# Altium PCB RADAR_D79_POWER_24V_v0.9.3.36_R10_3_36_IMPEDANCE_CLEAR_ROUTE_NATIVE.PcbDoc (part 8 of 9)
Units mil, origin at the board's own origin, x right, y up, seen from the top; angles counter-clockwise.
Board outline 3110.24 x 3110.24 mil, 10 copper layers (Top Layer, RF_GND, SIG_A0, SIG_A1, PWR_A, PWR_B, SIG_B1, SIG_B0, DIGITAL_GND, Bottom Layer), stack 79.002 mil thick; 304 components, 269 nets, 1408 pads, 1372 vias.
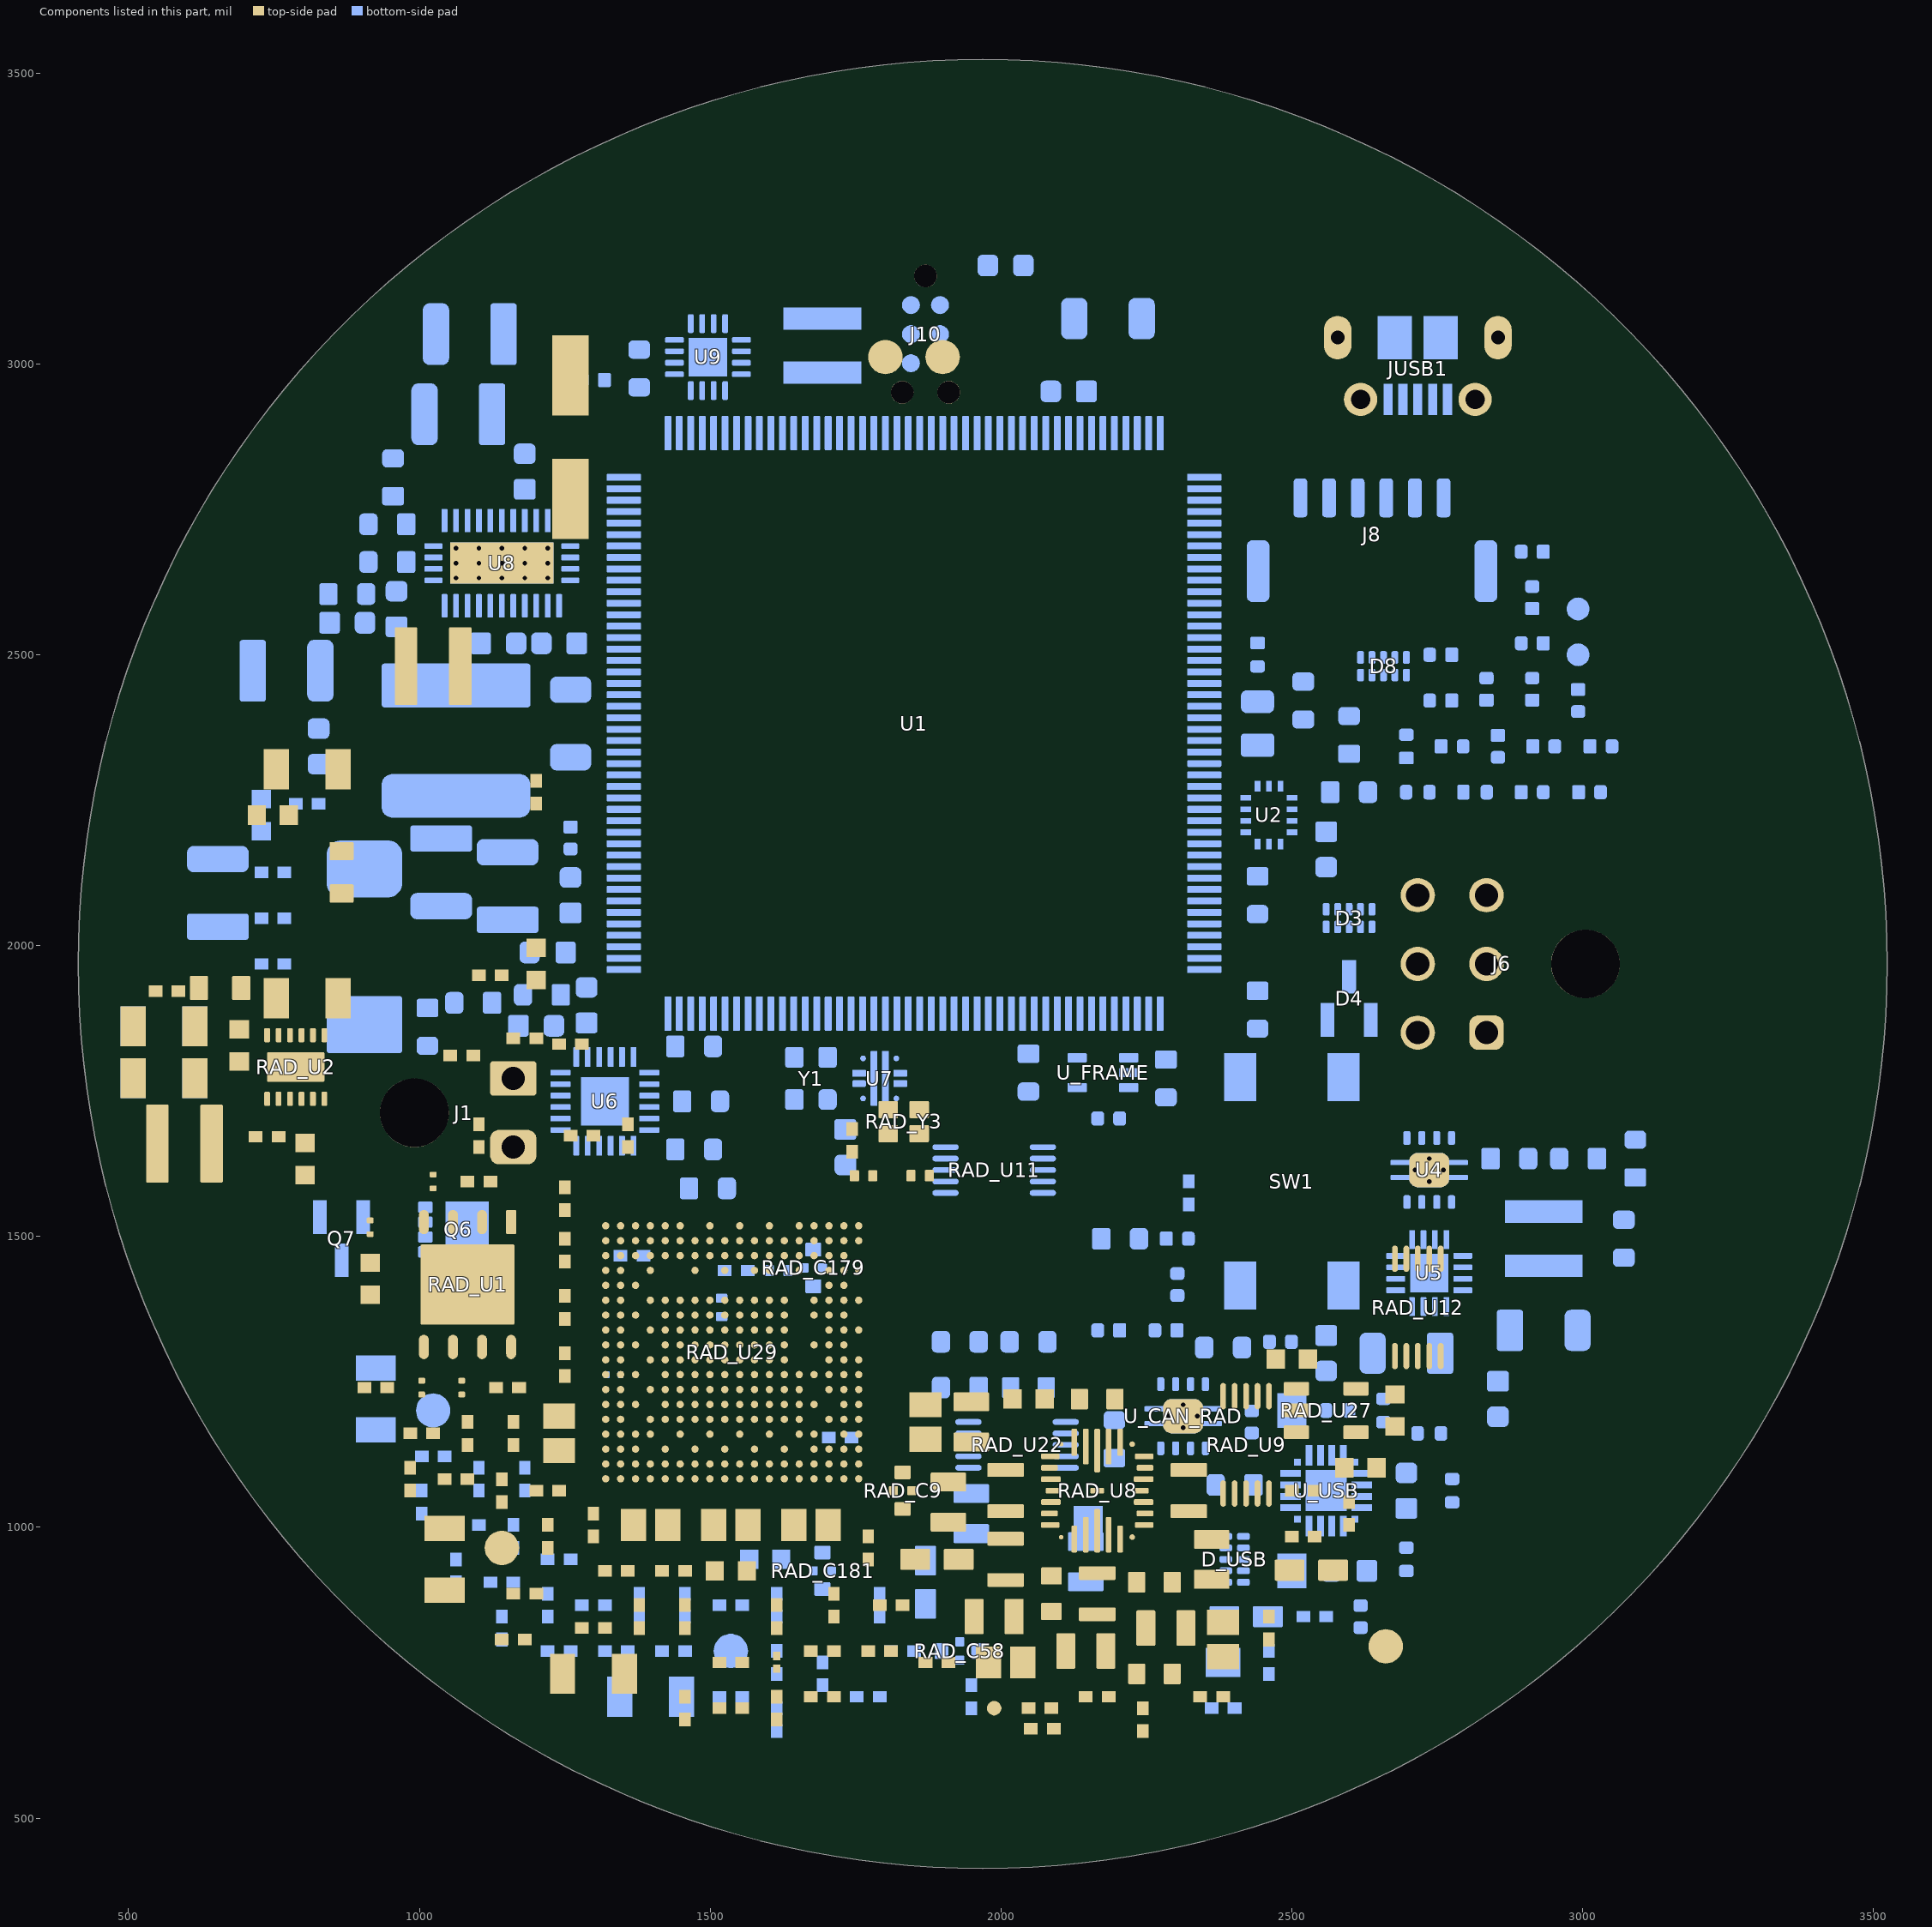
[diagram p16: the components of this part, seen from the top]

## Polygon pours and split planes (outlines as drawn) (continued)
V12_SYS on PWR_A "R10_3_28_V12_SYS_373" (solid, pour order 373): 1188.03,2108.08 1103.31,2025.78 1278.32,1845.63 1363.04,1927.92
V12_SYS on PWR_A "R10_3_28_V12_SYS_374" (solid, pour order 374): 1220.47,1988.19 1220.47,1870.08 1643.7,1870.08 1643.7,1988.19
V12_SYS on PWR_A "R10_3_28_V12_SYS_375" (solid, pour order 375): 1584.65,2012.65 1501.13,1929.13 1702.76,1727.51 1786.27,1811.02
V12_SYS on PWR_A "R10_3_28_V12_SYS_376" (solid, pour order 376): 1761.81,1870.08 1643.7,1870.08 1643.7,1692.91 1761.81,1692.91
V12_SYS on PWR_A "R10_3_28_V12_SYS_377" (solid, pour order 377): 1702.76,1835.49 1619.24,1751.97 1724.27,1646.94 1807.78,1730.46
V12_SYS on PWR_A "R10_3_28_V12_SYS_378" (solid, pour order 378): 1724.27,1742.98 1711.74,1730.46 1751.97,1690.23 1764.5,1702.76
V12_SYS on PWR_A "R10_3_28_V12_SYS_379" (solid, pour order 379): 1743.11,1711.61 1743.11,1693.9 1770.67,1693.9 1770.67,1711.61
V12_SYS on PWR_A "R10_3_28_V12_SYS_380" (solid, pour order 380): 1751.39,1709.7 1754.86,1692.33 1782.08,1697.78 1778.6,1715.15
RADAR_12V on PWR_A "R10_3_28_RADAR_12V_395" (solid, pour order 395): 1759.92,1840.79 1765.51,1826.07 1791.65,1835.98 1786.07,1850.71
RADAR_12V on PWR_A "R10_3_28_RADAR_12V_396" (solid, pour order 396): 1776.93,1850.71 1771.34,1835.98 1797.48,1826.07 1803.07,1840.79
RADAR_12V on PWR_A "R10_3_28_RADAR_12V_397" (solid, pour order 397): 1785.04,1844.09 1785.04,1828.35 1823.62,1828.35 1823.62,1844.09
RADAR_12V on PWR_A "R10_3_28_RADAR_12V_398" (solid, pour order 398): 675.37,1901.28 671.55,1886 694.71,1880.22 698.52,1895.49
RADAR_12V on PWR_A "R10_3_28_RADAR_12V_399" (solid, pour order 399): 681.1,1897.64 681.1,1881.89 716.54,1881.89 716.54,1897.64
RADAR_12V on PWR_A "R10_3_28_RADAR_12V_400" (solid, pour order 400): 697.64,1891.34 707.09,1878.74 727.56,1894.09 718.11,1906.69
RADAR_12V on PWR_A "R10_3_28_RADAR_12V_401" (solid, pour order 401): 706.58,1900.65 711.56,1885.71 738.31,1894.63 733.33,1909.57
RADAR_12V on PWR_A "R10_3_28_RADAR_12V_402" (solid, pour order 402): 720.47,1907.48 720.47,1891.73 765.75,1891.73 765.75,1907.48
RADAR_12V on PWR_A "R10_3_28_RADAR_12V_403" (solid, pour order 403): 746.79,1900.68 756.8,1888.52 802.42,1926.09 792.41,1938.25
RADAR_12V on PWR_A "R10_3_28_RADAR_12V_404" (solid, pour order 404): 786.36,1917.21 801.3,1922.19 792.38,1948.94 777.44,1943.96
RADAR_12V on PWR_A "R10_3_28_RADAR_12V_405" (solid, pour order 405): 779.53,1931.1 795.28,1931.1 795.28,1956.69 779.53,1956.69
RADAR_12V on PWR_A "R10_3_28_RADAR_12V_406" (solid, pour order 406): 776.38,1950.39 785.83,1937.8 806.3,1953.15 796.85,1965.75
RADAR_12V on PWR_A "R10_3_28_RADAR_12V_412" (solid, pour order 412): 690.16,1898.2 674.63,1900.79 670.07,1873.45 685.61,1870.86
RADAR_12V on PWR_A "R10_3_28_RADAR_12V_413" (solid, pour order 413): 687.01,1887.8 671.26,1887.8 671.26,1837.55 687.01,1837.55
RADAR_12V on PWR_A "R10_3_28_RADAR_12V_414" (solid, pour order 414): 704.72,1871.02 653.54,1871.02 653.54,1785.43 704.72,1785.43
RADAR_12V on PWR_A "R10_3_28_RADAR_12V_415" (solid, pour order 415): 680.86,1847.17 642.98,1812.75 685.53,1765.95 723.4,1800.38
RADAR_12V on PWR_A "R10_3_28_RADAR_12V_416" (solid, pour order 416): 687.78,1813.22 676.12,1802.63 717.97,1756.59 729.63,1767.19
VIN_RAW on PWR_A "R10_3_28_VIN_RAW_431" (solid, pour order 431): 966.78,1413.91 952.24,1403.79 978.1,1366.61 992.65,1376.72
VIN_RAW on PWR_A "R10_3_28_VIN_RAW_432" (solid, pour order 432): 989.17,1387.8 971.46,1387.8 971.46,1343.5 989.17,1343.5
VIN_RAW on PWR_A "R10_3_28_VIN_RAW_433" (solid, pour order 433): 990.51,1371.66 987.6,1389.13 964.22,1385.23 967.13,1367.76
VIN_RAW on PWR_A "R10_3_28_VIN_RAW_434" (solid, pour order 434): 983.27,1369.09 983.27,1386.81 955.71,1386.81 955.71,1369.09
VIN_RAW on PWR_A "R10_3_28_VIN_RAW_435" (solid, pour order 435): 974.87,1370.82 971.7,1388.25 943.44,1383.12 946.61,1365.68
VIN_RAW on PWR_A "R10_3_28_VIN_RAW_436" (solid, pour order 436): 962.6,1384.84 944.88,1384.84 944.88,1340.55 962.6,1340.55
VIN_RAW on PWR_A "R10_3_28_VIN_RAW_437" (solid, pour order 437): 963.52,1341.58 961.57,1359.19 935.1,1356.25 937.06,1338.64
VIN_RAW on PWR_A "R10_3_28_VIN_RAW_438" (solid, pour order 438): 953.74,1339.57 953.74,1357.28 926.18,1357.28 926.18,1339.57
VIN_RAW on PWR_A "R10_3_28_VIN_RAW_439" (solid, pour order 439): 929.95,1336.98 946.49,1343.34 935.21,1372.67 918.67,1366.31
VIN_RAW on PWR_A "R10_3_28_VIN_RAW_440" (solid, pour order 440): 991.95,1357.01 975.66,1363.99 962.78,1333.93 979.06,1326.95
VIN_RAW on PWR_A "R10_3_28_VIN_RAW_441" (solid, pour order 441): 981.05,1349.21 963.79,1345.22 970.72,1315.16 987.99,1319.15
VIN_PROTECTED_24V on PWR_A "R10_3_28_VIN_PROTECTED_24V_471" (solid, pour order 471): 1382.5,1655.81 1399.3,1650.21 1408.84,1678.83 1392.04,1684.43
VIN_PROTECTED_24V on PWR_A "R10_3_28_VIN_PROTECTED_24V_472" (solid, pour order 472): 1388.78,1664.37 1406.5,1664.37 1406.5,1711.61 1388.78,1711.61
VIN_PROTECTED_24V on PWR_A "R10_3_28_VIN_PROTECTED_24V_473" (solid, pour order 473): 1397.64,1690.23 1410.17,1702.76 1385.56,1727.36 1373.03,1714.83
VIN_PROTECTED_24V on PWR_A "R10_3_28_VIN_PROTECTED_24V_474" (solid, pour order 474): 1385.56,1656.37 1444.02,1714.83 1112.2,2046.65 1053.74,1988.19
VIN_PROTECTED_24V on PWR_A "R10_3_28_VIN_PROTECTED_24V_475" (solid, pour order 475): 1153.54,1946.85 1153.54,2029.53 687.01,2029.53 687.01,1946.85
VIN_PROTECTED_24V on PWR_A "R10_3_28_VIN_PROTECTED_24V_476" (solid, pour order 476): 728.35,1929.73 786.81,1988.19 600.39,2174.6 541.93,2116.14
VIN_PROTECTED_24V on PWR_A "R10_3_28_VIN_PROTECTED_24V_477" (solid, pour order 477): 559.06,2074.8 641.73,2074.8 641.73,2423.23 559.06,2423.23
VIN_PROTECTED_24V on PWR_A "R10_3_28_VIN_PROTECTED_24V_478" (solid, pour order 478): 541.93,2381.59 600.69,2323.43 1097.62,2825.45 1038.87,2883.62
VIN_PROTECTED_24V on PWR_A "R10_3_28_VIN_PROTECTED_24V_479" (solid, pour order 479): 1026.64,2825.09 1039.23,2812.63 1093.24,2867.19 1080.64,2879.65
VIN_RAW on PWR_A "R10_3_28_VIN_RAW_481" (solid, pour order 481): 952.04,1401.79 964.35,1389.05 1019.55,1442.41 1007.24,1455.15
VIN_RAW on PWR_A "R10_3_28_VIN_RAW_482" (solid, pour order 482): 948.57,1443.61 1006.04,1384.17 1141.13,1514.76 1083.67,1574.2
VIN_RAW on PWR_A "R10_3_28_VIN_RAW_483" (solid, pour order 483): 1041.34,1474.41 1124.02,1474.41 1124.02,1576.77 1041.34,1576.77
VIN_RAW on PWR_A "R10_3_28_VIN_RAW_484" (solid, pour order 484): 1024.22,1535.43 1082.68,1476.97 1170.67,1564.96 1112.2,1623.42
VIN_RAW on PWR_A "R10_3_28_VIN_RAW_485" (solid, pour order 485): 1070.87,1606.3 1070.87,1523.62 1192.91,1523.62 1192.91,1606.3
VIN_RAW on PWR_A "R10_3_28_VIN_RAW_486" (solid, pour order 486): 1093.11,1564.96 1151.57,1506.5 1278.93,1633.86 1220.47,1692.32
VIN_RAW on PWR_A "R10_3_28_VIN_RAW_487" (solid, pour order 487): 1179.13,1592.52 1261.81,1592.52 1261.81,1753.94 1179.13,1753.94
VIN_RAW on PWR_A "R10_3_28_VIN_RAW_488" (solid, pour order 488): 1220.47,1654.14 1278.93,1712.6 1203.18,1788.36 1144.71,1729.9
VIN_RAW on PWR_A "R10_3_28_VIN_RAW_489" (solid, pour order 489): 1203.18,1717.37 1215.7,1729.9 1161.42,1784.18 1148.89,1771.65
TI_1V2 on PWR_A "R10_3_28_TI_1V2_501" (solid, pour order 501): 1368.15,1343.75 1373.77,1335.67 1404.49,1357.04 1398.87,1365.12
TI_1V2 on PWR_A "R10_3_28_TI_1V2_502" (solid, pour order 502): 1393.29,1352.83 1403.07,1353.92 1401,1372.56 1391.22,1371.47
TI_PVIN3V3 on PWR_A "R10_3_28_TI_PVIN3V3_514" (solid, pour order 514): 2046.65,1059 2053.21,1066.33 2027.17,1089.63 2020.61,1082.29
TI_PVIN3V3 on PWR_A "R10_3_28_TI_PVIN3V3_515" (solid, pour order 515): 2022.64,1077.76 2032.48,1077.76 2032.48,1121.56 2022.64,1121.56
TI_PVIN3V3 on PWR_A "R10_3_28_TI_PVIN3V3_516" (solid, pour order 516): 2003.94,1093.02 2051.18,1093.02 2051.18,1175.2 2003.94,1175.2
TI_PVIN3V3 on PWR_A "R10_3_28_TI_PVIN3V3_517" (solid, pour order 517): 1994.15,1151.57 2027.56,1118.17 2070.81,1161.42 2037.4,1194.82
TI_PVIN3V3 on PWR_A "R10_3_28_TI_PVIN3V3_518" (solid, pour order 518): 2013.78,1185.04 2013.78,1137.8 2090.55,1137.8 2090.55,1185.04
TI_PVIN3V3 on PWR_A "R10_3_28_TI_PVIN3V3_519" (solid, pour order 519): 2033.52,1161.42 2066.93,1128.01 2110.18,1171.26 2076.77,1204.67
TI_PVIN3V3 on PWR_A "R10_3_28_TI_PVIN3V3_520" (solid, pour order 520): 2053.15,1147.64 2100.39,1147.64 2100.39,1225.43 2053.15,1225.43
TI_PVIN3V3 on PWR_A "R10_3_28_TI_PVIN3V3_521" (solid, pour order 521): 2071.85,1196.89 2081.69,1196.89 2081.69,1225.39 2071.85,1225.39
TI_PVIN3V3 on PWR_A "R10_3_28_TI_PVIN3V3_522" (solid, pour order 522): 2077.01,1213.52 2083.73,1220.71 2047,1254.99 2040.29,1247.79
TI_PVIN3V3 on PWR_A "R10_3_28_TI_PVIN3V3_523" (solid, pour order 523): 2047,1254.99 2040.29,1247.79 2077.01,1213.52 2083.73,1220.71
TI_PVIN3V3 on PWR_A "R10_3_28_TI_PVIN3V3_524" (solid, pour order 524): 2081.69,1225.39 2071.85,1225.39 2071.85,1196.89 2081.69,1196.89
TI_PVIN3V3 on PWR_A "R10_3_28_TI_PVIN3V3_525" (solid, pour order 525): 2100.39,1225.43 2053.15,1225.43 2053.15,1147.64 2100.39,1147.64
TI_PVIN3V3 on PWR_A "R10_3_28_TI_PVIN3V3_526" (solid, pour order 526): 2110.18,1171.26 2076.77,1204.67 2033.52,1161.42 2066.93,1128.01
TI_PVIN3V3 on PWR_A "R10_3_28_TI_PVIN3V3_527" (solid, pour order 527): 2090.55,1137.8 2090.55,1185.04 2013.78,1185.04 2013.78,1137.8
TI_PVIN3V3 on PWR_A "R10_3_28_TI_PVIN3V3_528" (solid, pour order 528): 2070.81,1161.42 2037.4,1194.82 1994.15,1151.57 2027.56,1118.17
TI_PVIN3V3 on PWR_A "R10_3_28_TI_PVIN3V3_529" (solid, pour order 529): 2051.18,1175.2 2003.94,1175.2 2003.94,744.09 2051.18,744.09
TI_PVIN3V3 on PWR_A "R10_3_28_TI_PVIN3V3_530" (solid, pour order 530): 2027.56,801.12 1994.15,767.72 2076.77,685.1 2110.18,718.5
TI_PVIN3V3 on PWR_A "R10_3_28_TI_PVIN3V3_531" (solid, pour order 531): 2053.15,742.13 2053.15,694.88 2326.77,694.88 2326.77,742.13
TI_PVIN3V3 on PWR_A "R10_3_28_TI_PVIN3V3_532" (solid, pour order 532): 2269.74,718.5 2303.15,685.1 2494.04,875.98 2460.63,909.39
TI_PVIN3V3 on PWR_A "R10_3_28_TI_PVIN3V3_533" (solid, pour order 533): 2437.01,852.36 2484.25,852.36 2484.25,909.45 2437.01,909.45
TI_PVIN3V3 on PWR_A "R10_3_28_TI_PVIN3V3_534" (solid, pour order 534): 2427.22,885.83 2460.63,852.42 2523.56,915.35 2490.16,948.76
TI_PVIN3V3 on PWR_A "R10_3_28_TI_PVIN3V3_535" (solid, pour order 535): 2466.54,938.98 2466.54,891.73 2523.62,891.73 2523.62,938.98
TI_PVIN3V3 on PWR_A "R10_3_28_TI_PVIN3V3_536" (solid, pour order 536): 2466.59,915.35 2500,881.95 2553.09,935.04 2519.68,968.45
TI_PVIN3V3 on PWR_A "R10_3_28_TI_PVIN3V3_537" (solid, pour order 537): 2496.06,911.42 2543.31,911.42 2543.31,1047.24 2496.06,1047.24
TI_PVIN3V3 on PWR_A "R10_3_28_TI_PVIN3V3_538" (solid, pour order 538): 2486.28,1023.62 2519.68,990.22 2690.89,1161.42 2657.48,1194.82
TI_PVIN3V3 on PWR_A "R10_3_28_TI_PVIN3V3_539" (solid, pour order 539): 2633.86,1185.04 2633.86,1137.8 2740.16,1137.8 2740.16,1185.04
TI_PVIN3V3 on PWR_A "R10_3_28_TI_PVIN3V3_540" (solid, pour order 540): 2683.13,1161.42 2716.54,1128.01 2809,1220.47 2775.59,1253.88
TI_PVIN3V3 on PWR_A "R10_3_28_TI_PVIN3V3_541" (solid, pour order 541): 2751.97,1196.85 2799.21,1196.85 2799.21,1303.15 2751.97,1303.15
TI_PVIN3V3 on PWR_A "R10_3_28_TI_PVIN3V3_542" (solid, pour order 542): 2775.59,1246.12 2809,1279.53 2706.69,1381.83 2673.29,1348.43
TI_PVIN3V3 on PWR_A "R10_3_28_TI_PVIN3V3_543" (solid, pour order 543): 2730.32,1324.8 2730.32,1372.05 2486.22,1372.05 2486.22,1324.8
TI_PVIN3V3 on PWR_A "R10_3_28_TI_PVIN3V3_544" (solid, pour order 544): 2543.23,1347.43 2510.84,1381.82 2437.94,1313.14 2470.34,1278.76
TI_PVIN3V3 on PWR_A "R10_3_28_TI_PVIN3V3_545" (solid, pour order 545): 2478.29,1311.94 2471.54,1319.1 2421.39,1271.86 2428.14,1264.7
TI_PVIN3V3 on PWR_A "R10_3_28_TI_PVIN3V3_546" (solid, pour order 546): 2283.71,1085.53 2274.51,1089.03 2267.27,1069.98 2276.47,1066.49
TI_PVIN3V3 on PWR_A "R10_3_28_TI_PVIN3V3_547" (solid, pour order 547): 2278.54,1077.76 2268.7,1077.76 2268.7,1038.39 2278.54,1038.39
TI_PVIN3V3 on PWR_A "R10_3_28_TI_PVIN3V3_548" (solid, pour order 548): 2273.62,1050.27 2266.66,1043.31 2287.06,1022.91 2294.02,1029.87
TI_PVIN3V3 on PWR_A "R10_3_28_TI_PVIN3V3_549" (solid, pour order 549): 2287.06,1063.28 2253.65,1029.87 2342.52,941 2375.93,974.41
TI_PVIN3V3 on PWR_A "R10_3_28_TI_PVIN3V3_550" (solid, pour order 550): 2366.14,998.03 2318.9,998.03 2318.9,933.36 2366.14,933.36
TI_PVIN3V3 on PWR_A "R10_3_28_TI_PVIN3V3_551" (solid, pour order 551): 2347.44,961.9 2337.6,961.9 2337.6,949.8 2347.44,949.8
TI_PVIN3V3 on PWR_A "R10_3_28_TI_PVIN3V3_552" (solid, pour order 552): 2349.48,954.72 2342.52,961.68 2315.87,935.04 2322.83,928.08
TI_PVIN3V3 on PWR_A "R10_3_28_TI_PVIN3V3_553" (solid, pour order 553): 2327.76,930.12 2327.76,939.96 2298.23,939.96 2298.23,930.12
TI_PVIN3V3 on PWR_A "R10_3_28_TI_PVIN3V3_554" (solid, pour order 554): 2306.39,928.88 2309.31,938.28 2291.05,943.96 2288.13,934.56
VIN_PROTECTED_24V on PWR_A "R10_3_28_VIN_PROTECTED_24V_555" (solid, pour order 555): 1084.82,2872.74 1075.1,2871.24 1078.56,2848.72 1088.29,2850.22
VIN_PROTECTED_24V on PWR_A "R10_3_28_VIN_PROTECTED_24V_556" (solid, pour order 556): 1087.6,2859.25 1077.76,2859.25 1077.76,2839.57 1087.6,2839.57
VIN_PROTECTED_24V on PWR_A "R10_3_28_VIN_PROTECTED_24V_557" (solid, pour order 557): 1089.64,2844.49 1082.68,2851.45 1050.07,2818.84 1057.03,2811.88
VIN_PROTECTED_24V on PWR_A "R10_3_28_VIN_PROTECTED_24V_558" (solid, pour order 558): 1115.49,2818.84 1057.03,2877.31 541.93,2362.2 600.39,2303.74
VIN_PROTECTED_24V on PWR_A "R10_3_28_VIN_PROTECTED_24V_559" (solid, pour order 559): 641.73,2403.54 559.06,2403.54 559.06,2074.8 641.73,2074.8
VIN_PROTECTED_24V on PWR_A "R10_3_28_VIN_PROTECTED_24V_560" (solid, pour order 560): 600.39,2174.6 541.93,2116.14 738.19,1919.88 796.65,1978.35
VIN_PROTECTED_24V on PWR_A "R10_3_28_VIN_PROTECTED_24V_561" (solid, pour order 561): 696.85,2019.68 696.85,1937.01 1084.65,1937.01 1084.65,2019.68
VIN_PROTECTED_24V on PWR_A "R10_3_28_VIN_PROTECTED_24V_562" (solid, pour order 562): 1043.31,2036.81 984.85,1978.35 1181.1,1782.09 1239.56,1840.55
VIN_PROTECTED_24V on PWR_A "R10_3_28_VIN_PROTECTED_24V_563" (solid, pour order 563): 1222.44,1881.89 1139.76,1881.89 1139.76,1789.37 1222.44,1789.37
VIN_PROTECTED_24V on PWR_A "R10_3_28_VIN_PROTECTED_24V_564" (solid, pour order 564): 1181.1,1889.17 1122.64,1830.71 1289.37,1663.98 1347.83,1722.44
VIN_PROTECTED_24V on PWR_A "R10_3_28_VIN_PROTECTED_24V_565" (solid, pour order 565): 1330.71,1763.78 1248.03,1763.78 1248.03,1516.52 1330.71,1516.52
VIN_PROTECTED_24V on PWR_A "R10_3_28_VIN_PROTECTED_24V_566" (solid, pour order 566): 1294.29,1562.78 1284.45,1562.78 1284.45,1500.98 1294.29,1500.98
VIN_PROTECTED_24V on PWR_A "R10_3_28_VIN_PROTECTED_24V_567" (solid, pour order 567): 1290.73,1512.73 1282.55,1507.27 1291.94,1493.18 1300.13,1498.64
TI_1V2 on PWR_B "R10_3_28_TI_1V2_129" (solid, pour order 129): 2201.71,688.62 2209.02,682.03 2269.75,749.38 2262.44,755.97
TI_1V2 on PWR_B "R10_3_28_TI_1V2_169" (solid, pour order 169): 1592.59,888.95 1585.46,895.74 1538.32,846.29 1545.44,839.5
TI_1V2 on PWR_B "R10_3_28_TI_1V2_170" (solid, pour order 170): 1550.2,851.38 1540.35,851.38 1540.35,840.96 1550.2,840.96
TI_1V2 on PWR_B "R10_3_28_TI_1V2_171" (solid, pour order 171): 1562.99,863.6 1527.56,863.6 1527.56,681.1 1562.99,681.1
TI_1V2 on PWR_B "R10_3_28_TI_1V2_172" (solid, pour order 172): 1545.28,723.87 1520.22,698.82 1624.02,595.02 1649.07,620.08
TI_1V2 on PWR_B "R10_3_28_TI_1V2_173" (solid, pour order 173): 1606.3,637.8 1606.3,602.36 2153.54,602.36 2153.54,637.8
TI_1V2 on PWR_B "R10_3_28_TI_1V2_174" (solid, pour order 174): 2110.78,620.77 2135.13,595.03 2190.8,647.7 2166.46,673.44
TI_1V2 on PWR_B "R10_3_28_TI_1V2_175" (solid, pour order 175): 2158.8,648.59 2165.57,641.44 2215.62,688.78 2208.85,695.93
TI_1V2 on PWR_B "R10_3_28_TI_1V2_176" (solid, pour order 176): 2267.25,754.36 2257.45,753.47 2259.32,732.84 2269.13,733.73
TI_1V2 on PWR_B "R10_3_28_TI_1V2_177" (solid, pour order 177): 2268.7,743.11 2258.86,743.11 2258.86,723.43 2268.7,723.43
TI_1V2 on PWR_B "R10_3_28_TI_1V2_178" (solid, pour order 178): 2263.78,735.31 2256.82,728.35 2290.89,694.28 2297.85,701.24
TI_1V2 on PWR_B "R10_3_28_TI_1V2_179" (solid, pour order 179): 2290.89,726.29 2265.84,701.24 2342.52,624.55 2367.57,649.61
TI_1V2 on PWR_B "R10_3_28_TI_1V2_180" (solid, pour order 180): 2324.8,667.32 2324.8,631.89 2547.24,631.89 2547.24,667.32
TI_1V2 on PWR_B "R10_3_28_TI_1V2_181" (solid, pour order 181): 2504.47,649.61 2529.53,624.55 2771.12,866.14 2746.06,891.2
TI_1V2 on PWR_B "R10_3_28_TI_1V2_182" (solid, pour order 182): 2728.35,848.43 2763.78,848.43 2763.78,1041.34 2728.35,1041.34
TI_1V2 on PWR_B "R10_3_28_TI_1V2_183" (solid, pour order 183): 2746.06,998.57 2771.12,1023.62 2529.53,1265.21 2504.47,1240.16
TI_1V2 on PWR_B "R10_3_28_TI_1V2_184" (solid, pour order 184): 2511.81,1222.44 2547.24,1222.44 2547.24,1280.17 2511.81,1280.17
TI_1V2 on PWR_B "R10_3_28_TI_1V2_185" (solid, pour order 185): 2524.61,1257.53 2534.45,1257.53 2534.45,1313.98 2524.61,1313.98
TI_1V2 on PWR_B "R10_3_28_TI_1V2_186" (solid, pour order 186): 2526.42,1302.83 2535.75,1305.94 2528.7,1327.09 2519.37,1323.98
TI_REGOUT_3V3 on PWR_B "R10_3_28_TI_REGOUT_3V3_187" (solid, pour order 187): 467.13,1750.36 478.94,1750.36 478.94,1793.67 467.13,1793.67
TI_REGOUT_3V3 on PWR_B "R10_3_28_TI_REGOUT_3V3_188" (solid, pour order 188): 467.13,1781.86 478.94,1781.86 478.94,1851.28 467.13,1851.28
TI_REGOUT_3V3 on PWR_B "R10_3_28_TI_REGOUT_3V3_189" (solid, pour order 189): 467.13,1839.47 478.94,1839.47 478.94,1882.78 467.13,1882.78
TI_REGOUT_3V3 on PWR_B "R10_3_28_TI_REGOUT_3V3_190" (solid, pour order 190): 1830.26,979.67 1839.22,971.99 1858.72,994.74 1849.75,1002.42
TI_REGOUT_3V3 on PWR_B "R10_3_28_TI_REGOUT_3V3_191" (solid, pour order 191): 1844.49,988.19 1856.3,988.19 1856.3,1009.84 1844.49,1009.84
TI_REGOUT_3V3 on PWR_B "R10_3_28_TI_REGOUT_3V3_192" (solid, pour order 192): 1851.32,1012.24 1842.09,1004.86 1865.22,975.95 1874.44,983.33
TI_REGOUT_3V3 on PWR_B "R10_3_28_TI_REGOUT_3V3_193" (solid, pour order 193): 1844.49,998.03 1856.3,998.03 1856.3,1029.53 1844.49,1029.53
TI_REGOUT_3V3 on PWR_B "R10_3_28_TI_REGOUT_3V3_194" (solid, pour order 194): 1842.04,1023.62 1850.39,1015.27 1877.45,1042.32 1869.09,1050.67
TI_REGOUT_3V3 on PWR_B "R10_3_28_TI_REGOUT_3V3_195" (solid, pour order 195): 465.57,1880.63 469.27,1869.41 489.74,1876.16 486.04,1887.38
TI_REGOUT_3V3 on PWR_B "R10_3_28_TI_REGOUT_3V3_196" (solid, pour order 196): 476.38,1885.83 476.38,1874.02 537.5,1874.02 537.5,1885.83
TI_REGOUT_3V3 on PWR_B "R10_3_28_TI_REGOUT_3V3_197" (solid, pour order 197): 507.97,1903.54 507.97,1856.3 653.54,1856.3 653.54,1903.54
TI_REGOUT_3V3 on PWR_B "R10_3_28_TI_REGOUT_3V3_198" (solid, pour order 198): 596.51,1879.92 629.92,1846.51 702.7,1919.29 669.29,1952.7
TI_REGOUT_3V3 on PWR_B "R10_3_28_TI_REGOUT_3V3_199" (solid, pour order 199): 645.67,1942.91 645.67,1895.67 786.07,1895.67 786.07,1942.91
TI_REGOUT_3V3 on PWR_B "R10_3_28_TI_REGOUT_3V3_200" (solid, pour order 200): 756.54,1925.2 756.54,1913.39 773.62,1913.39 773.62,1925.2
TI_REGOUT_3V3 on PWR_B "R10_3_28_TI_REGOUT_3V3_201" (solid, pour order 201): 767.68,1927.64 759.37,1919.26 805.94,1873.07 814.26,1881.45
TI_REGOUT_3V3 on PWR_B "R10_3_28_TI_REGOUT_3V3_202" (solid, pour order 202): 800.85,1888.06 799.26,1876.36 821.99,1873.28 823.58,1884.98
TI_REGOUT_3V3 on PWR_B "R10_3_28_TI_REGOUT_3V3_203" (solid, pour order 203): 811.02,1885.83 811.02,1874.02 870.77,1874.02 870.77,1885.83
TI_REGOUT_3V3 on PWR_B "R10_3_28_TI_REGOUT_3V3_204" (solid, pour order 204): 841.24,1903.54 841.24,1856.3 1037.4,1856.3 1037.4,1903.54
TI_REGOUT_3V3 on PWR_B "R10_3_28_TI_REGOUT_3V3_205" (solid, pour order 205): 980.37,1879.92 1013.78,1846.51 1057.03,1889.76 1023.62,1923.17
TI_REGOUT_3V3 on PWR_B "R10_3_28_TI_REGOUT_3V3_206" (solid, pour order 206): 1000,1913.39 1000,1866.14 1293.31,1866.14 1293.31,1913.39
TI_REGOUT_3V3 on PWR_B "R10_3_28_TI_REGOUT_3V3_207" (solid, pour order 207): 1269.68,1923.17 1236.28,1889.76 1338.58,1787.46 1371.99,1820.87
TI_REGOUT_3V3 on PWR_B "R10_3_28_TI_REGOUT_3V3_208" (solid, pour order 208): 1314.96,1844.49 1314.96,1797.24 1716.54,1797.24 1716.54,1844.49
TI_REGOUT_3V3 on PWR_B "R10_3_28_TI_REGOUT_3V3_209" (solid, pour order 209): 1692.91,1854.27 1659.51,1820.87 1712.6,1767.77 1746.01,1801.18
TI_REGOUT_3V3 on PWR_B "R10_3_28_TI_REGOUT_3V3_210" (solid, pour order 210): 1736.22,1824.8 1688.98,1824.8 1688.98,1767.72 1736.22,1767.72
TI_REGOUT_3V3 on PWR_B "R10_3_28_TI_REGOUT_3V3_211" (solid, pour order 211): 1712.6,1824.75 1679.19,1791.34 1722.44,1748.09 1755.85,1781.5
TI_REGOUT_3V3 on PWR_B "R10_3_28_TI_REGOUT_3V3_212" (solid, pour order 212): 1698.82,1805.12 1698.82,1757.87 1765.75,1757.87 1765.75,1805.12
TI_REGOUT_3V3 on PWR_B "R10_3_28_TI_REGOUT_3V3_213" (solid, pour order 213): 1742.13,1814.9 1708.72,1781.5 1840.55,1649.66 1873.96,1683.07
TI_REGOUT_3V3 on PWR_B "R10_3_28_TI_REGOUT_3V3_214" (solid, pour order 214): 1864.17,1706.69 1816.93,1706.69 1816.93,1610.24 1864.17,1610.24
TI_REGOUT_3V3 on PWR_B "R10_3_28_TI_REGOUT_3V3_215" (solid, pour order 215): 1840.55,1667.26 1807.14,1633.86 1878.69,1562.31 1912.1,1595.71
TI_REGOUT_3V3 on PWR_B "R10_3_28_TI_REGOUT_3V3_216" (solid, pour order 216): 1878.69,1604.07 1870.34,1595.71 1909.45,1556.61 1917.8,1564.96
TI_REGOUT_3V3 on PWR_B "R10_3_28_TI_REGOUT_3V3_217" (solid, pour order 217): 1916.92,1568.7 1905.71,1572.43 1897.06,1546.46 1908.26,1542.73
TI_REGOUT_3V3 on PWR_B "R10_3_28_TI_REGOUT_3V3_218" (solid, pour order 218): 1904.53,1583.6 1871.12,1550.2 2019.68,1401.63 2053.09,1435.04
TI_REGOUT_3V3 on PWR_B "R10_3_28_TI_REGOUT_3V3_219" (solid, pour order 219): 2043.31,1458.66 1996.06,1458.66 1996.06,1155.51 2043.31,1155.51
TI_REGOUT_3V3 on PWR_B "R10_3_28_TI_REGOUT_3V3_220" (solid, pour order 220): 2053.09,1179.13 2019.68,1212.54 1849.47,1042.32 1882.87,1008.92
TI_REGOUT_3V3 on PWR_B "R10_3_28_TI_REGOUT_3V3_221" (solid, pour order 221): 1906.5,1018.7 1906.5,1065.94 1845.47,1065.94 1845.47,1018.7
TI_REGOUT_3V3 on PWR_B "R10_3_28_TI_REGOUT_3V3_222" (solid, pour order 222): 2019.68,1212.54 1986.28,1179.13 2086.61,1078.8 2120.02,1112.2
TI_REGOUT_3V3 on PWR_B "R10_3_28_TI_REGOUT_3V3_223" (solid, pour order 223): 2062.99,1135.83 2062.99,1088.58 2437.01,1088.58 2437.01,1135.83
TI_3V3 on PWR_B "R10_3_28_TI_3V3_224" (solid, pour order 224): 1066.5,1060.55 1065.43,1048.79 1088.02,1046.73 1089.09,1058.5
TI_3V3 on PWR_B "R10_3_28_TI_3V3_225" (solid, pour order 225): 1076.77,1059.06 1076.77,1047.24 1108.27,1047.24 1108.27,1059.06
TI_3V3 on PWR_B "R10_3_28_TI_3V3_226" (solid, pour order 226): 1094.02,1052.73 1102.78,1044.81 1156.96,1104.75 1148.2,1112.67
TI_3V3 on PWR_B "R10_3_28_TI_3V3_227" (solid, pour order 227): 1143.68,1111.07 1141.89,1099.39 1166.36,1095.63 1168.15,1107.3
TI_3V3 on PWR_B "R10_3_28_TI_3V3_228" (solid, pour order 228): 1155.51,1108.27 1155.51,1096.46 1206.69,1096.46 1206.69,1108.27
TI_3V3 on PWR_B "R10_3_28_TI_3V3_229" (solid, pour order 229): 1200.79,1110.71 1192.44,1102.36 1220.47,1074.33 1228.82,1082.68
TI_3V3 on PWR_B "R10_3_28_TI_3V3_230" (solid, pour order 230): 1226.38,1088.58 1214.57,1088.58 1214.57,1047.24 1226.38,1047.24
TI_3V3 on PWR_B "R10_3_28_TI_3V3_231" (solid, pour order 231): 1221.15,1061.47 1212.15,1053.82 1236.53,1025.14 1245.53,1032.79
TI_3V3 on PWR_B "R10_3_28_TI_3V3_232" (solid, pour order 232): 1229.85,1029.51 1241.16,1026.11 1247.51,1047.27 1236.2,1050.66
TI_3V3 on PWR_B "R10_3_28_TI_3V3_233" (solid, pour order 233): 1234.25,1037.4 1246.06,1037.4 1246.06,1059.06 1234.25,1059.06
TI_3V3 on PWR_B "R10_3_28_TI_3V3_234" (solid, pour order 234): 1240.16,1044.8 1248.51,1053.15 1220.47,1081.19 1212.12,1072.83
TI_3V3 on PWR_B "R10_3_28_TI_3V3_235" (solid, pour order 235): 1214.57,1066.93 1226.38,1066.93 1226.38,1089.84 1214.57,1089.84
TI_3V3 on PWR_B "R10_3_28_TI_3V3_236" (solid, pour order 236): 1196.85,1060.31 1244.09,1060.31 1244.09,1165.35 1196.85,1165.35
TI_3V3 on PWR_B "R10_3_28_TI_3V3_237" (solid, pour order 237): 1187.07,1141.73 1220.47,1108.33 1277.98,1165.83 1244.57,1199.24
TI_3V3 on PWR_B "R10_3_28_TI_3V3_238" (solid, pour order 238): 1236.22,1165.83 1244.57,1157.48 1258.35,1171.26 1250,1179.61
TI_3V3 on PWR_B "R10_3_28_TI_3V3_239" (solid, pour order 239): 1244.09,1177.17 1244.09,1165.35 1265.75,1165.35 1265.75,1177.17
TI_3V3 on PWR_B "R10_3_28_TI_3V3_240" (solid, pour order 240): 1259.84,1179.61 1251.49,1171.26 1269.68,1153.07 1278.04,1161.42
TI_3V3 on PWR_B "R10_3_28_TI_3V3_241" (solid, pour order 241): 1263.78,1167.32 1263.78,1155.51 1295.28,1155.51 1295.28,1167.32
TI_3V3 on PWR_B "R10_3_28_TI_3V3_242" (solid, pour order 242): 1287.17,1169.47 1281.31,1159.22 1298.46,1149.42 1304.32,1159.68
TI_3V3 on PWR_B "R10_3_28_TI_3V3_243" (solid, pour order 243): 1295.67,1165.81 1287.93,1156.89 1330.24,1120.17 1337.98,1129.09
TI_3V3 on PWR_B "R10_3_28_TI_3V3_244" (solid, pour order 244): 1327.3,1161.82 1296.33,1126.14 1350.78,1078.88 1381.75,1114.56
TI_3V3 on PWR_B "R10_3_28_TI_3V3_245" (solid, pour order 245): 1372.05,1135.83 1324.8,1135.83 1324.8,1069.22 1372.05,1069.22
TI_3V3 on PWR_B "R10_3_28_TI_3V3_246" (solid, pour order 246): 1348.03,1100.86 1340.08,1092.12 1381.3,1054.65 1389.25,1063.39
TI_3V3 on PWR_B "R10_3_28_TI_3V3_267" (solid, pour order 267): 1386.81,1057.09 1386.81,1068.9 1342.52,1068.9 1342.52,1057.09
TI_3V3 on PWR_B "R10_3_28_TI_3V3_268" (solid, pour order 268): 1348.43,1054.64 1356.78,1062.99 1338.58,1081.19 1330.23,1072.83
TI_3V3 on PWR_B "R10_3_28_TI_3V3_269" (solid, pour order 269): 1344.49,1066.93 1344.49,1078.74 1320.02,1078.74 1320.02,1066.93
TI_3V3 on PWR_B "R10_3_28_TI_3V3_270" (solid, pour order 270): 1349.55,1049.21 1349.55,1096.46 1295.28,1096.46 1295.28,1049.21
TI_3V3 on PWR_B "R10_3_28_TI_3V3_271" (solid, pour order 271): 1352.3,1072.83 1318.9,1106.24 1275.65,1062.99 1309.06,1029.59
TI_3V3 on PWR_B "R10_3_28_TI_3V3_272" (solid, pour order 272): 1309.06,1029.59 1342.46,1062.99 1259.84,1145.61 1226.44,1112.2
TI_3V3 on PWR_B "R10_3_28_TI_3V3_273" (solid, pour order 273): 1283.46,1088.58 1283.46,1135.83 1009.84,1135.83 1009.84,1088.58
TI_3V3 on PWR_B "R10_3_28_TI_3V3_274" (solid, pour order 274): 1066.87,1112.2 1033.46,1145.61 990.22,1102.36 1023.62,1068.96
TI_3V3 on PWR_B "R10_3_28_TI_3V3_275" (solid, pour order 275): 1047.24,1078.74 1047.24,1125.98 960.63,1125.98 960.63,1078.74
TI_3V3 on PWR_B "R10_3_28_TI_3V3_276" (solid, pour order 276): 1017.66,1102.36 984.25,1135.77 891.79,1043.31 925.2,1009.9
TI_3V3 on PWR_B "R10_3_28_TI_3V3_277" (solid, pour order 277): 948.82,1066.93 901.57,1066.93 901.57,921.26 948.82,921.26
TI_3V3 on PWR_B "R10_3_28_TI_3V3_278" (solid, pour order 278): 925.2,978.29 891.79,944.88 1072.83,763.84 1106.24,797.24
TI_3V3 on PWR_B "R10_3_28_TI_3V3_279" (solid, pour order 279): 1049.21,820.87 1049.21,773.62 1381.89,773.62 1381.89,820.87
TI_3V3 on PWR_B "R10_3_28_TI_3V3_280" (solid, pour order 280): 1358.27,830.65 1324.86,797.24 1515.75,606.36 1549.15,639.76
TI_3V3 on PWR_B "R10_3_28_TI_3V3_281" (solid, pour order 281): 1539.37,663.39 1492.13,663.39 1492.13,596.46 1539.37,596.46
TI_3V3 on PWR_B "R10_3_28_TI_3V3_282" (solid, pour order 282): 1515.75,653.49 1482.34,620.08 1663.39,439.03 1696.79,472.44
TI_3V3 on PWR_B "R10_3_28_TI_3V3_283" (solid, pour order 283): 1629.98,472.44 1663.39,439.03 1814.9,590.55 1781.5,623.96
TI_3V3 on PWR_B "R10_3_28_TI_3V3_284" (solid, pour order 284): 1757.87,614.17 1757.87,566.93 2543.31,566.93 2543.31,614.17
TI_3V3 on PWR_B "R10_3_28_TI_3V3_285" (solid, pour order 285): 2486.28,590.55 2519.68,557.14 2809,846.46 2775.59,879.86
TI_3V3 on PWR_B "R10_3_28_TI_3V3_286" (solid, pour order 286): 2751.97,822.83 2799.21,822.83 2799.21,1235.15 2751.97,1235.15
TI_3V3 on PWR_B "R10_3_28_TI_3V3_287" (solid, pour order 287): 2769.68,1205.62 2781.5,1205.62 2781.5,1226.38 2769.68,1226.38
TI_3V3 on PWR_B "R10_3_28_TI_3V3_288" (solid, pour order 288): 2775.59,1212.12 2783.94,1220.47 2746.06,1258.35 2737.71,1250
TI_3V3 on PWR_B "R10_3_28_TI_3V3_289" (solid, pour order 289): 2754.41,1250 2746.06,1258.35 2731.81,1244.09 2740.16,1235.74
TI_PMICOUT_1V8 on PWR_B "R10_3_28_TI_PMICOUT_1V8_290" (solid, pour order 290): 1806.03,915.18 1813.17,908.4 1857.35,954.9 1850.22,961.68
TI_PMICOUT_1V8 on PWR_B "R10_3_28_TI_PMICOUT_1V8_291" (solid, pour order 291): 1845.47,959.65 1845.47,949.8 1860.07,949.8 1860.07,959.65
TI_PMICOUT_1V8 on PWR_B "R10_3_28_TI_PMICOUT_1V8_292" (solid, pour order 292): 1839.4,970.47 1839.4,938.98 1895.67,938.98 1895.67,970.47
TI_PMICOUT_1V8 on PWR_B "R10_3_28_TI_PMICOUT_1V8_293" (solid, pour order 293): 1857.65,954.72 1879.92,932.45 1937.8,990.33 1915.53,1012.6
TI_PMICOUT_1V8 on PWR_B "R10_3_28_TI_PMICOUT_1V8_294" (solid, pour order 294): 1908.57,990.33 1915.53,983.37 1955.78,1023.62 1948.82,1030.58
TI_PMICOUT_1V8 on PWR_B "R10_3_28_TI_PMICOUT_1V8_295" (solid, pour order 295): 1944.77,1029.29 1943.16,1019.58 1964.68,1015.99 1966.29,1025.7
TI_PMICOUT_1V8 on PWR_B "R10_3_28_TI_PMICOUT_1V8_296" (solid, pour order 296): 1966.6,1025.23 1957.05,1027.62 1952.69,1010.2 1962.24,1007.81
TI_PMICOUT_1V8 on PWR_B "R10_3_28_TI_PMICOUT_1V8_297" (solid, pour order 297): 1963.58,1018.7 1953.74,1018.7 1953.74,969.49 1963.58,969.49
TI_PMICOUT_1V8 on PWR_B "R10_3_28_TI_PMICOUT_1V8_298" (solid, pour order 298): 1958.66,981.37 1951.7,974.41 1966.84,959.27 1973.8,966.23
TI_PMICOUT_1V8 on PWR_B "R10_3_28_TI_PMICOUT_1V8_299" (solid, pour order 299): 1966.84,988.5 1944.57,966.23 2027.56,883.24 2049.83,905.51
TI_PMICOUT_1V8 on PWR_B "R10_3_28_TI_PMICOUT_1V8_300" (solid, pour order 300): 2043.31,921.26 2011.81,921.26 2011.81,801.18 2043.31,801.18
TI_PMICOUT_1V8 on PWR_B "R10_3_28_TI_PMICOUT_1V8_301" (solid, pour order 301): 2027.56,839.2 2005.29,816.93 2066.93,755.29 2089.2,777.56
TI_PMICOUT_1V8 on PWR_B "R10_3_28_TI_PMICOUT_1V8_302" (solid, pour order 302): 2051.18,793.31 2051.18,761.81 2240.16,761.81 2240.16,793.31
TI_PMICOUT_1V8 on PWR_B "R10_3_28_TI_PMICOUT_1V8_303" (solid, pour order 303): 2202.14,777.56 2224.41,755.29 2276.21,807.09 2253.94,829.36
TI_PMICOUT_1V8 on PWR_B "R10_3_28_TI_PMICOUT_1V8_304" (solid, pour order 304): 2238.19,822.83 2238.19,791.34 2387.8,791.34 2387.8,822.83
TI_PMICOUT_1V8 on PWR_B "R10_3_28_TI_PMICOUT_1V8_305" (solid, pour order 305): 2372.05,829.36 2349.78,807.09 2421.26,735.6 2443.53,757.87
TI_PMICOUT_1V8 on PWR_B "R10_3_28_TI_PMICOUT_1V8_306" (solid, pour order 306): 2405.51,773.62 2405.51,742.13 2574.8,742.13 2574.8,773.62
TI_PMICOUT_1V8 on PWR_B "R10_3_28_TI_PMICOUT_1V8_307" (solid, pour order 307): 2536.78,757.87 2559.06,735.6 2675.77,852.32 2653.5,874.59
TI_PMICOUT_1V8 on PWR_B "R10_3_28_TI_PMICOUT_1V8_308" (solid, pour order 308): 2646.54,852.32 2653.5,845.36 2684.13,875.98 2677.17,882.94
TI_PMICOUT_1V8 on PWR_B "R10_3_28_TI_PMICOUT_1V8_309" (solid, pour order 309): 2672.24,871.06 2682.09,871.06 2682.09,906.5 2672.24,906.5
TI_PMICOUT_1V8 on PWR_B "R10_3_28_TI_PMICOUT_1V8_310" (solid, pour order 310): 1806.04,914.99 1813.36,908.4 1837.66,935.41 1830.34,941.99
TI_PMICOUT_1V8 on PWR_B "R10_3_28_TI_PMICOUT_1V8_311" (solid, pour order 311): 1825.79,939.96 1825.79,930.12 1868.2,930.12 1868.2,939.96
TI_PMICOUT_1V8 on PWR_B "R10_3_28_TI_PMICOUT_1V8_312" (solid, pour order 312): 1847.53,950.79 1847.53,919.29 1895.67,919.29 1895.67,950.79
TI_PMICOUT_1V8 on PWR_B "R10_3_28_TI_PMICOUT_1V8_313" (solid, pour order 313): 1879.92,957.31 1857.65,935.04 2037.4,755.29 2059.67,777.56
TI_PMICOUT_1V8 on PWR_B "R10_3_28_TI_PMICOUT_1V8_314" (solid, pour order 314): 2021.65,793.31 2021.65,761.81 2240.16,761.81 2240.16,793.31
TI_PMICOUT_1V8 on PWR_B "R10_3_28_TI_PMICOUT_1V8_315" (solid, pour order 315): 2202.14,777.56 2224.41,755.29 2276.21,807.09 2253.94,829.36
TI_PMICOUT_1V8 on PWR_B "R10_3_28_TI_PMICOUT_1V8_316" (solid, pour order 316): 2238.19,822.83 2238.19,791.34 2387.8,791.34 2387.8,822.83
TI_PMICOUT_1V8 on PWR_B "R10_3_28_TI_PMICOUT_1V8_317" (solid, pour order 317): 2372.05,829.36 2349.78,807.09 2421.26,735.6 2443.53,757.87
TI_PMICOUT_1V8 on PWR_B "R10_3_28_TI_PMICOUT_1V8_318" (solid, pour order 318): 2405.51,773.62 2405.51,742.13 2574.8,742.13 2574.8,773.62
TI_PMICOUT_1V8 on PWR_B "R10_3_28_TI_PMICOUT_1V8_319" (solid, pour order 319): 2536.78,757.87 2559.06,735.6 2675.77,852.32 2653.5,874.59
TI_PMICOUT_1V8 on PWR_B "R10_3_28_TI_PMICOUT_1V8_320" (solid, pour order 320): 2646.54,852.32 2653.5,845.36 2684.13,875.98 2677.17,882.94
TI_PMICOUT_1V8 on PWR_B "R10_3_28_TI_PMICOUT_1V8_321" (solid, pour order 321): 2672.24,871.06 2682.09,871.06 2682.09,906.5 2672.24,906.5
V12_SYS on PWR_B "R10_3_28_V12_SYS_333" (solid, pour order 333): 1026.88,2209.62 1038.41,2196.17 1079.42,2231.32 1067.89,2244.77
V12_SYS on PWR_B "R10_3_28_V12_SYS_381" (solid, pour order 381): 1888.93,1675.14 1906.55,1673.38 1909.3,1700.85 1891.67,1702.61
V12_SYS on PWR_B "R10_3_28_V12_SYS_382" (solid, pour order 382): 1890.75,1684.06 1908.46,1684.06 1908.46,1750.94 1890.75,1750.94
V12_SYS on PWR_B "R10_3_28_V12_SYS_383" (solid, pour order 383): 1840.55,1683.02 1958.66,1683.02 1958.66,1879.92 1840.55,1879.92
V12_SYS on PWR_B "R10_3_28_V12_SYS_384" (solid, pour order 384): 1899.61,1737.35 1983.12,1820.87 1722.44,2081.55 1638.92,1998.03
V12_SYS on PWR_B "R10_3_28_V12_SYS_385" (solid, pour order 385): 1781.5,1938.98 1781.5,2057.09 1476.38,2057.09 1476.38,1938.98
V12_SYS on PWR_B "R10_3_28_V12_SYS_386" (solid, pour order 386): 1535.43,1914.51 1618.95,1998.03 1427.17,2189.82 1343.65,2106.3
V12_SYS on PWR_B "R10_3_28_V12_SYS_387" (solid, pour order 387): 1368.11,2047.24 1486.22,2047.24 1486.22,2185.04 1368.11,2185.04
V12_SYS on PWR_B "R10_3_28_V12_SYS_388" (solid, pour order 388): 1343.65,2125.98 1427.17,2042.47 1530.37,2145.67 1446.85,2229.19
V12_SYS on PWR_B "R10_3_28_V12_SYS_389" (solid, pour order 389): 1387.8,2204.72 1387.8,2086.61 2303.15,2086.61 2303.15,2204.72
V12_SYS on PWR_B "R10_3_28_V12_SYS_390" (solid, pour order 390): 2244.09,2229.19 2160.58,2145.67 2627.95,1678.29 2711.47,1761.81
V12_SYS on PWR_B "R10_3_28_V12_SYS_391" (solid, pour order 391): 2687.01,1820.87 2568.9,1820.87 2568.9,1417.32 2687.01,1417.32
V12_SYS on PWR_B "R10_3_28_V12_SYS_392" (solid, pour order 392): 2627.09,1559.89 2544.44,1475.52 2683.08,1339.7 2765.74,1424.08
V12_SYS on PWR_B "R10_3_28_V12_SYS_393" (solid, pour order 393): 2682.09,1435.74 2669.7,1423.09 2724.54,1369.36 2736.94,1382.02
RADAR_12V on PWR_B "R10_3_28_RADAR_12V_394" (solid, pour order 394): 1739.37,1844.09 1739.37,1828.35 1777.95,1828.35 1777.95,1844.09
RADAR_12V on PWR_B "R10_3_28_RADAR_12V_407" (solid, pour order 407): 687.93,1773.74 682.95,1758.8 703.8,1751.85 708.78,1766.79
RADAR_12V on PWR_B "R10_3_28_RADAR_12V_408" (solid, pour order 408): 690.94,1769.68 690.94,1753.94 716.54,1753.94 716.54,1769.68
RADAR_12V on PWR_B "R10_3_28_RADAR_12V_409" (solid, pour order 409): 697.86,1764.51 705.96,1751.01 729.31,1765.02 721.2,1778.52
RADAR_12V on PWR_B "R10_3_28_RADAR_12V_410" (solid, pour order 410): 1738.19,1768.93 1774.38,1805.12 1588.58,1990.91 1552.39,1954.72
RADAR_12V on PWR_B "R10_3_28_RADAR_12V_411" (solid, pour order 411): 1614.17,1929.13 1614.17,1980.32 769.68,1980.32 769.68,1929.13
RADAR_12V on PWR_B "R10_3_28_RADAR_12V_417" (solid, pour order 417): 786.37,1948.04 801.96,1945.82 806.15,1975.19 790.56,1977.41
RADAR_12V on PWR_B "R10_3_28_RADAR_12V_418" (solid, pour order 418): 789.37,1960.63 805.12,1960.63 805.12,2021.51 789.37,2021.51
RADAR_12V on PWR_B "R10_3_28_RADAR_12V_419" (solid, pour order 419): 771.65,1988.05 822.83,1988.05 822.83,2250 771.65,2250
RADAR_12V on PWR_B "R10_3_28_RADAR_12V_420" (solid, pour order 420): 761.05,2224.41 797.24,2188.22 951.54,2342.52 915.35,2378.71
RADAR_12V on PWR_B "R10_3_28_RADAR_12V_421" (solid, pour order 421): 889.76,2316.93 940.94,2316.93 940.94,2391.87 889.76,2391.87
RADAR_12V on PWR_B "R10_3_28_RADAR_12V_422" (solid, pour order 422): 907.48,2358.41 923.23,2358.41 923.23,2419.29 907.48,2419.29
RADAR_12V on PWR_B "R10_3_28_RADAR_12V_423" (solid, pour order 423): 908.67,2402.51 924.26,2404.74 920.07,2434.11 904.48,2431.88
RADAR_12V on PWR_B "R10_3_28_RADAR_12V_424" (solid, pour order 424): 902.25,2425.48 913.11,2414.06 967.32,2465.61 956.46,2477.02
RADAR_12V on PWR_B "R10_3_28_RADAR_12V_425" (solid, pour order 425): 920,2466.8 955.27,2429.71 1069.64,2538.46 1034.38,2575.55
RADAR_12V on PWR_B "R10_3_28_RADAR_12V_426" (solid, pour order 426): 1007.87,2513.78 1059.06,2513.78 1059.06,2712.6 1007.87,2712.6
RADAR_12V on PWR_B "R10_3_28_RADAR_12V_427" (solid, pour order 427): 997.27,2687.01 1033.46,2650.82 1118.87,2736.22 1082.68,2772.41
RADAR_12V on PWR_B "R10_3_28_RADAR_12V_428" (solid, pour order 428): 1057.09,2761.81 1057.09,2710.63 1113.5,2710.63 1113.5,2761.81
RADAR_12V on PWR_B "R10_3_28_RADAR_12V_429" (solid, pour order 429): 1080.04,2744.09 1080.04,2728.35 1100.39,2728.35 1100.39,2744.09
RADAR_12V on PWR_B "R10_3_28_RADAR_12V_430" (solid, pour order 430): 1081.42,2737.07 1091.67,2725.12 1144.96,2770.8 1134.71,2782.76
VIN_PROTECTED_24V on PWR_B "R10_3_28_VIN_PROTECTED_24V_442" (solid, pour order 442): 1280.79,1499.62 1293.69,1487.48 1353.07,1550.58 1340.17,1562.72
VIN_PROTECTED_24V on PWR_B "R10_3_28_VIN_PROTECTED_24V_443" (solid, pour order 443): 1328.34,1553.01 1337.73,1537.99 1360.63,1552.3 1351.24,1567.32
VIN_PROTECTED_24V on PWR_B "R10_3_28_VIN_PROTECTED_24V_444" (solid, pour order 444): 1339.57,1563.98 1339.57,1546.26 1367.13,1546.26 1367.13,1563.98
VIN_PROTECTED_24V on PWR_B "R10_3_28_VIN_PROTECTED_24V_445" (solid, pour order 445): 1346.58,1559.62 1353.77,1543.43 1378.82,1554.56 1371.62,1570.75
VIN_PROTECTED_24V on PWR_B "R10_3_28_VIN_PROTECTED_24V_446" (solid, pour order 446): 1361.83,1570.41 1355.77,1553.76 1383.25,1543.77 1389.3,1560.42
VIN_PROTECTED_24V on PWR_B "R10_3_28_VIN_PROTECTED_24V_447" (solid, pour order 447): 1369.09,1563.98 1369.09,1546.26 1396.65,1546.26 1396.65,1563.98
VIN_PROTECTED_24V on PWR_B "R10_3_28_VIN_PROTECTED_24V_448" (solid, pour order 448): 1375.3,1554.16 1388.76,1542.63 1406.19,1562.97 1392.74,1574.5
VIN_PROTECTED_24V on PWR_B "R10_3_28_VIN_PROTECTED_24V_449" (solid, pour order 449): 1382.63,1556.15 1399.56,1550.94 1408.71,1580.66 1391.78,1585.87
VIN_PROTECTED_24V on PWR_B "R10_3_28_VIN_PROTECTED_24V_450" (solid, pour order 450): 1388.78,1565.94 1406.5,1565.94 1406.5,1593.5 1388.78,1593.5
VIN_PROTECTED_24V on PWR_B "R10_3_28_VIN_PROTECTED_24V_451" (solid, pour order 451): 1386.12,1579.71 1402.57,1573.13 1413.09,1599.42 1396.64,1606
VIN_PROTECTED_24V on PWR_B "R10_3_28_VIN_PROTECTED_24V_452" (solid, pour order 452): 1396.64,1582.97 1413.09,1589.55 1402.57,1615.85 1386.12,1609.27
VIN_PROTECTED_24V on PWR_B "R10_3_28_VIN_PROTECTED_24V_453" (solid, pour order 453): 1388.78,1595.47 1406.5,1595.47 1406.5,1632.87 1388.78,1632.87
VIN_PROTECTED_24V on PWR_B "R10_3_28_VIN_PROTECTED_24V_454" (solid, pour order 454): 1399.41,1611.61 1410.04,1625.79 1387.99,1642.32 1377.36,1628.15
VIN_PROTECTED_24V on PWR_B "R10_3_28_VIN_PROTECTED_24V_455" (solid, pour order 455): 1382.25,1619.9 1399.79,1622.4 1395.31,1653.72 1377.77,1651.22
VIN_PROTECTED_24V on PWR_B "R10_3_28_VIN_PROTECTED_24V_456" (solid, pour order 456): 1378.94,1634.84 1396.65,1634.84 1396.65,1662.4 1378.94,1662.4
VIN_PROTECTED_24V on PWR_B "R10_3_28_VIN_PROTECTED_24V_457" (solid, pour order 457): 1375.39,1651.77 1389.57,1641.14 1406.1,1663.19 1391.93,1673.82
VIN_PROTECTED_24V on PWR_B "R10_3_28_VIN_PROTECTED_24V_458" (solid, pour order 458): 1140.73,2793.6 1157.18,2800.18 1146.67,2826.48 1130.22,2819.9
VIN_PROTECTED_24V on PWR_B "R10_3_28_VIN_PROTECTED_24V_459" (solid, pour order 459): 1132.87,2806.1 1150.59,2806.1 1150.59,2892.72 1132.87,2892.72
VIN_PROTECTED_24V on PWR_B "R10_3_28_VIN_PROTECTED_24V_460" (solid, pour order 460): 1145.69,2871.97 1153.62,2887.82 1125.96,2901.65 1118.04,2885.8
VIN_PROTECTED_24V on PWR_B "R10_3_28_VIN_PROTECTED_24V_461" (solid, pour order 461): 1118.72,2895.37 1124.32,2878.56 1152.94,2888.1 1147.33,2904.91
VIN_PROTECTED_24V on PWR_B "R10_3_28_VIN_PROTECTED_24V_462" (solid, pour order 462): 1132.87,2902.56 1132.87,2884.84 1160.43,2884.84 1160.43,2902.56
VIN_PROTECTED_24V on PWR_B "R10_3_28_VIN_PROTECTED_24V_463" (solid, pour order 463): 1139.37,2896.52 1148.76,2881.49 1187.4,2905.65 1178.01,2920.67
VIN_PROTECTED_24V on PWR_B "R10_3_28_VIN_PROTECTED_24V_464" (solid, pour order 464): 1171.24,2896.58 1187.08,2904.5 1167.35,2943.97 1151.5,2936.05
VIN_PROTECTED_24V on PWR_B "R10_3_28_VIN_PROTECTED_24V_465" (solid, pour order 465): 1133.88,2877.88 1141.81,2893.73 1118.09,2905.59 1110.16,2889.74
VIN_PROTECTED_24V on PWR_B "R10_3_28_VIN_PROTECTED_24V_466" (solid, pour order 466): 1130.91,2884.84 1130.91,2902.56 1071.85,2902.56 1071.85,2884.84
VIN_PROTECTED_24V on PWR_B "R10_3_28_VIN_PROTECTED_24V_467" (solid, pour order 467): 1089.57,2902.56 1071.85,2902.56 1071.85,2858.27 1089.57,2858.27
VIN_PROTECTED_24V on PWR_B "R10_3_28_VIN_PROTECTED_24V_468" (solid, pour order 468): 1070.29,2886.75 1087.66,2883.28 1093.1,2910.49 1075.73,2913.97
VIN_PROTECTED_24V on PWR_B "R10_3_28_VIN_PROTECTED_24V_469" (solid, pour order 469): 1073.82,2894.68 1091.54,2894.68 1091.54,2922.24 1073.82,2922.24
VIN_PROTECTED_24V on PWR_B "R10_3_28_VIN_PROTECTED_24V_470" (solid, pour order 470): 1072.98,2905.45 1090.61,2903.69 1093.36,2931.16 1075.73,2932.92
VIN_PROTECTED_24V on PWR_B "R10_3_28_VIN_PROTECTED_24V_480" (solid, pour order 480): 1080.42,2879.65 1068.18,2866.83 1145.96,2792.59 1158.19,2805.41
RADAR_12V on PWR_B "R10_3_28_RADAR_12V_490" (solid, pour order 490): 906.43,2425.37 913.21,2418.24 963.14,2465.71 956.36,2472.85
RADAR_12V on PWR_B "R10_3_28_RADAR_12V_491" (solid, pour order 491): 920,2466.8 955.27,2429.71 1069.64,2538.46 1034.38,2575.55
RADAR_12V on PWR_B "R10_3_28_RADAR_12V_492" (solid, pour order 492): 1007.87,2513.78 1059.06,2513.78 1059.06,2712.6 1007.87,2712.6
RADAR_12V on PWR_B "R10_3_28_RADAR_12V_493" (solid, pour order 493): 997.27,2687.01 1033.46,2650.82 1118.87,2736.22 1082.68,2772.41
RADAR_12V on PWR_B "R10_3_28_RADAR_12V_494" (solid, pour order 494): 1057.09,2761.81 1057.09,2710.63 1113.5,2710.63 1113.5,2761.81
RADAR_12V on PWR_B "R10_3_28_RADAR_12V_495" (solid, pour order 495): 1082.99,2741.14 1082.99,2731.3 1097.44,2731.3 1097.44,2741.14
RADAR_12V on PWR_B "R10_3_28_RADAR_12V_496" (solid, pour order 496): 1085.58,2736.75 1091.99,2729.28 1140.8,2771.12 1134.39,2778.59
TI_3V3 on PWR_B "R10_3_28_TI_3V3_497" (solid, pour order 497): 1295.77,1164.42 1289.32,1156.99 1330.14,1121.55 1336.6,1128.99
TI_3V3 on PWR_B "R10_3_28_TI_3V3_498" (solid, pour order 498): 1327.3,1161.82 1296.33,1126.14 1350.78,1078.88 1381.75,1114.56
TI_3V3 on PWR_B "R10_3_28_TI_3V3_499" (solid, pour order 499): 1372.05,1135.83 1324.8,1135.83 1324.8,1069.22 1372.05,1069.22
TI_3V3 on PWR_B "R10_3_28_TI_3V3_500" (solid, pour order 500): 1348.09,1099.47 1341.47,1092.19 1381.24,1056.04 1387.86,1063.32
TI_1V2 on PWR_B "R10_3_28_TI_1V2_503" (solid, pour order 503): 1592.59,888.95 1585.46,895.74 1538.32,846.29 1545.44,839.5
TI_1V2 on PWR_B "R10_3_28_TI_1V2_504" (solid, pour order 504): 1550.2,851.38 1540.35,851.38 1540.35,840.96 1550.2,840.96
TI_1V2 on PWR_B "R10_3_28_TI_1V2_505" (solid, pour order 505): 1562.99,863.6 1527.56,863.6 1527.56,681.1 1562.99,681.1
TI_1V2 on PWR_B "R10_3_28_TI_1V2_506" (solid, pour order 506): 1545.28,723.87 1520.22,698.82 1604.33,614.71 1629.39,639.76
TI_1V2 on PWR_B "R10_3_28_TI_1V2_507" (solid, pour order 507): 1586.61,657.48 1586.61,622.05 1848.43,622.05 1848.43,657.48
TI_1V2 on PWR_B "R10_3_28_TI_1V2_508" (solid, pour order 508): 1805.65,639.76 1830.71,614.71 1885.29,669.29 1860.24,694.35
TI_1V2 on PWR_B "R10_3_28_TI_1V2_509" (solid, pour order 509): 1842.52,687.01 1842.52,651.57 2143.7,651.57 2143.7,687.01
TI_1V2 on PWR_B "R10_3_28_TI_1V2_510" (solid, pour order 510): 2125.98,694.35 2100.93,669.29 2135.83,634.39 2160.88,659.45
TI_1V2 on PWR_B "R10_3_28_TI_1V2_511" (solid, pour order 511): 2118.11,677.17 2118.11,641.73 2178.49,641.73 2178.49,677.17
TI_1V2 on PWR_B "R10_3_28_TI_1V2_512" (solid, pour order 512): 2155.85,664.37 2155.85,654.53 2180.12,654.53 2180.12,664.37
TI_1V2 on PWR_B "R10_3_28_TI_1V2_513" (solid, pour order 513): 2168.25,659.88 2174.76,652.5 2215.61,688.54 2209.1,695.92